# Altium PCB OmniCore_SDR.PcbDoc (part 3 of 14)
Units mil, origin at the board's own origin, x right, y up, seen from the top; angles counter-clockwise.
Board outline 4724.72 x 2755.91 mil, 8 copper layers (Top, GND 1, Layer 1, Layer 2, GND 2, Layer 3, Power, Bottom), stack 40.468 mil thick; 534 components, 427 nets, 2325 pads, 1892 vias.
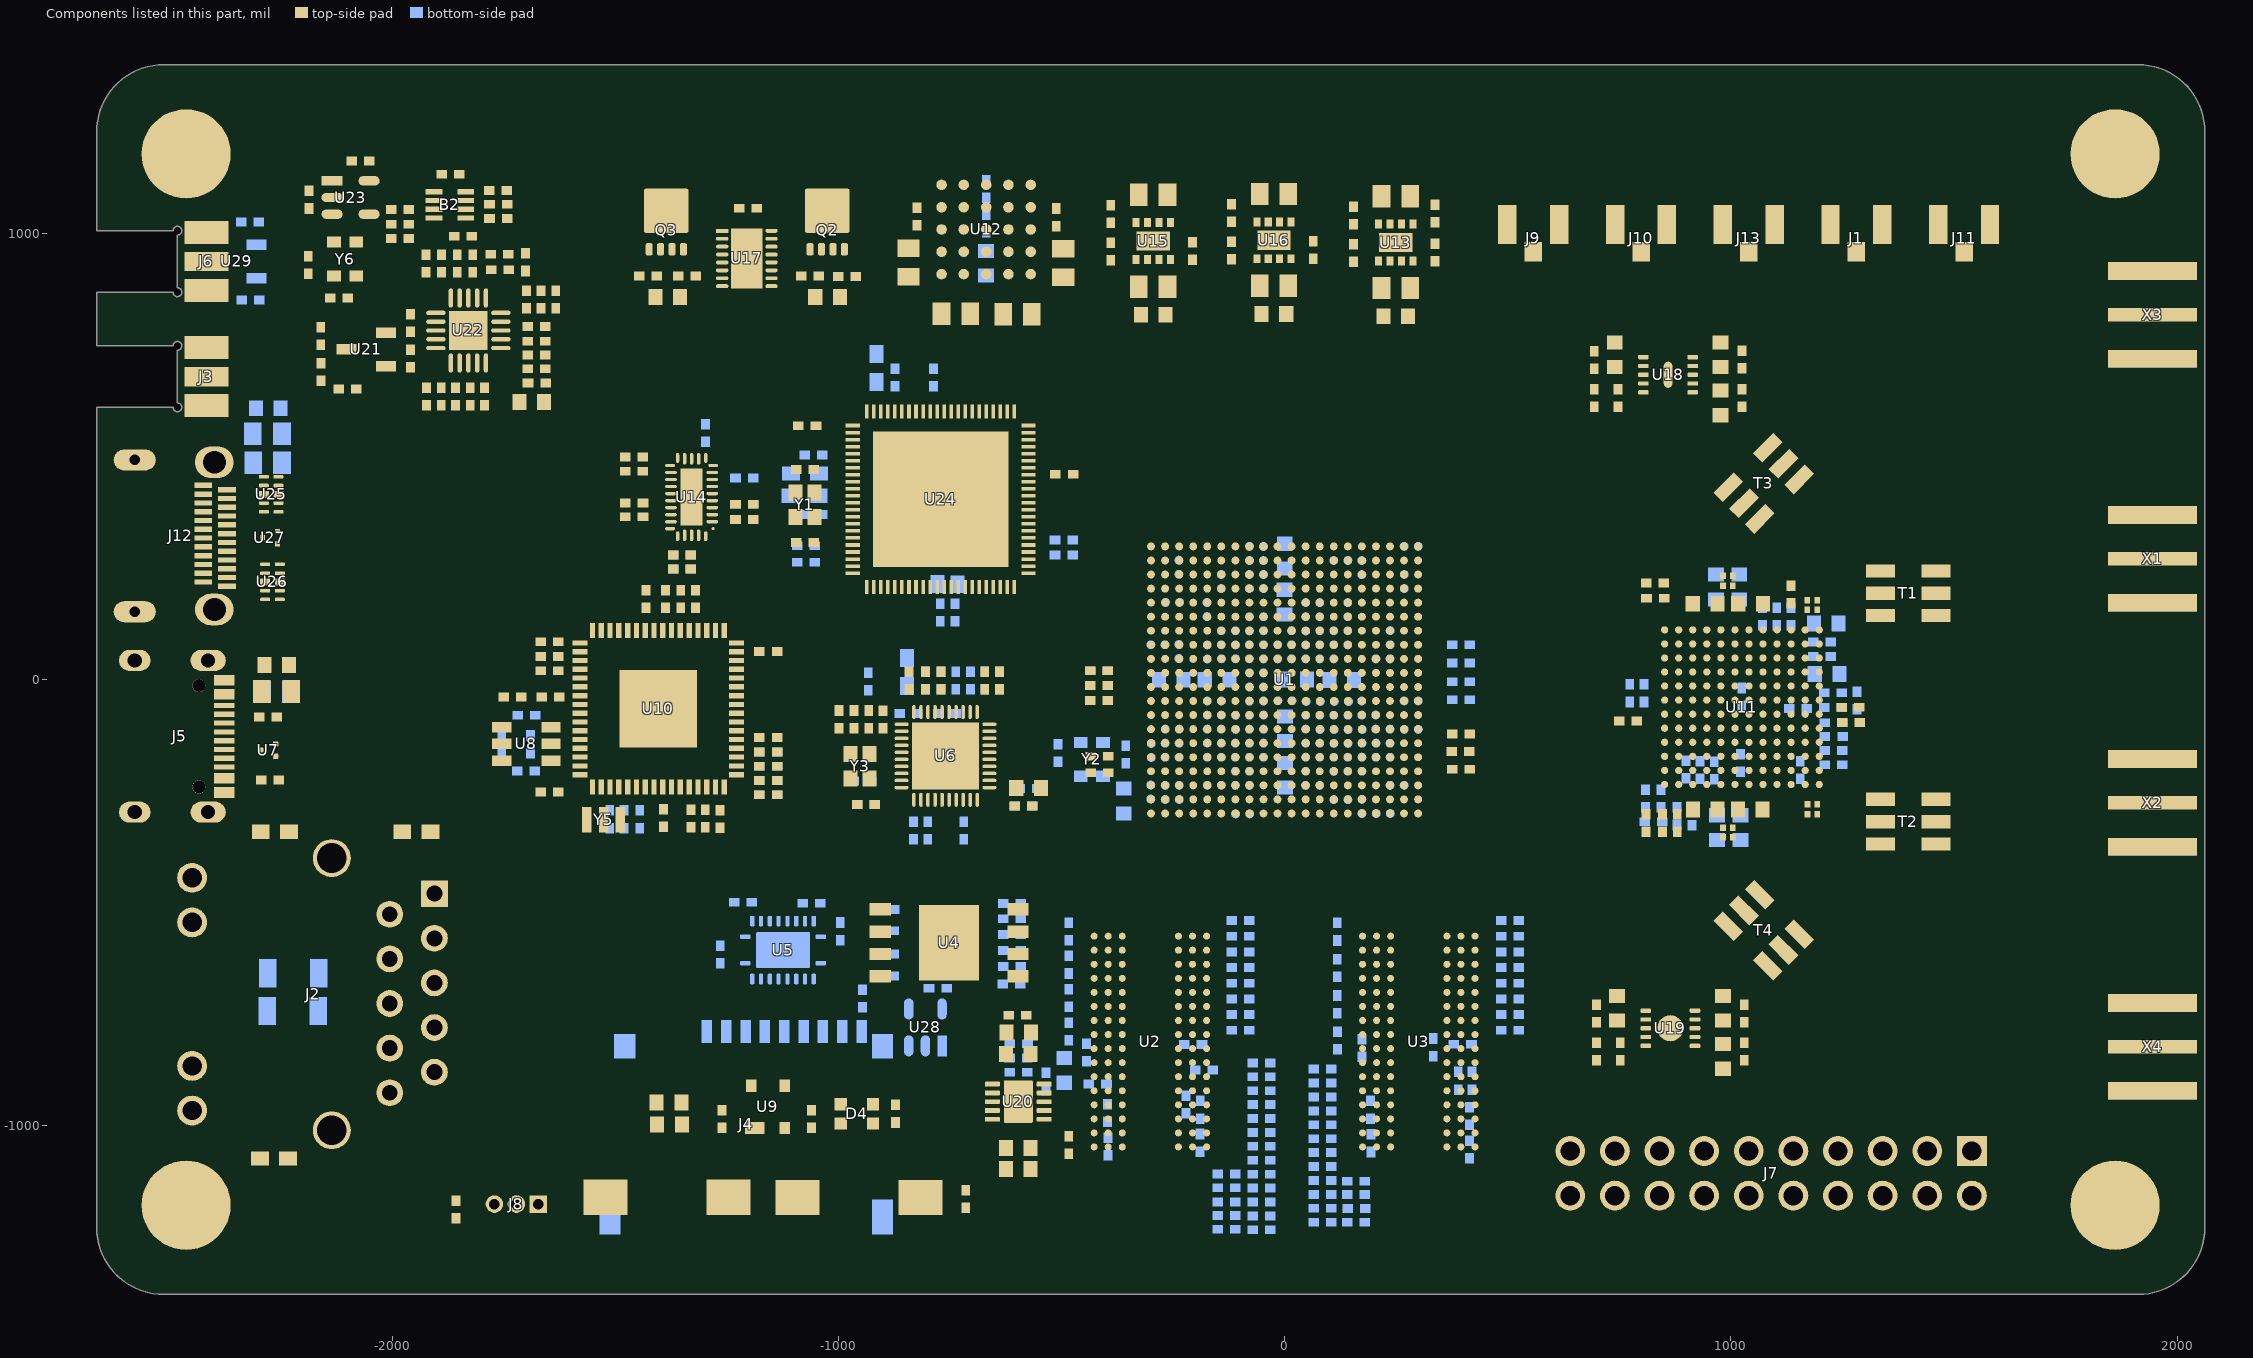
[diagram p8: the components of this part, seen from the top]

## Part data (continued)
U13 U15 U16: library part CMP-2000-07569-1, "Step-Down Converter MicroSiP(TM) Module with Integrated Inductor, 3 A, 3 to 17 V, -40 to 125 degC, 8-Pin uSiP (SIL), Tape and Reel", Case/Package=SMD/SMT, Manufacturer="Texas Instruments", Max Input Voltage=17V, Max Operating Temperature=125degC, Max Output Current=3A, Max Output Voltage=5V, Min Input Voltage=3V, Min Operating Temperature=-40degC, Min Output Voltage=900mV, Package Description="8-Pin Single In-line Package, Body 3 x 2.8 mm, Pitch 0.65 mm", Package Reference=SIL0008D, Quiescent Current=20uA, Switching Frequency=2MHz, Datasheet URL=http://www.ti.com/lit/ds/symlink/tps82130.pdf, Datasheet Version="Rev. C, 01/2017", Height=0.06inch, Lead Free=LeadFree, Length=0.12inch, Manufacturer URL=http://www.ti.com/, Mount=SurfaceMount, Mounting Technology=SurfaceMount, Number of Outputs=1, Number of Pins=8, Output Current=3A, Output Voltage=5V, Packaging=CutTape, REACH SVHC=NoSVHC, RoHSCompliant=True, Voltage - Output 1=5V, Width=0.11inch
U14: library part CMP-04877-000019-1, "USB TYPE-C DRP PORT CONTROLLER W", Max Operating Temperature=70°C, Max Supply Voltage=5.5V, Min Operating Temperature=0°C, Min Supply Voltage=3V, Data Rate=10Gbps, Lead Free="Lead Free", Mount="Surface Mount", Number of Pins=30, Number Of Ports=1, Packaging="Tape and Reel", REACH SVHC="No SVHC", RoHS Compliant=Yes, Usb Standard="USB 3.1"
U17: library part CMP-0479-00067-2, "IC OR CTRLR LOAD SHARE 16DFN", Case/Package="DFN EP", Max Operating Temperature=85°C, Max Supply Voltage=18V, Min Operating Temperature=-40°C, Min Supply Voltage=3V, Package Quantity=91, Lead Free="Lead Free", Number of Drivers=2, Number of Outputs=2, Number of Pins=16, Propagation Delay=1000ns, REACH SVHC="No SVHC", RoHS Compliant=Yes, Series=-, Turn-Off Delay Time=1us, Turn-On Delay Time=400ns
U18 U19: library part CMP-04917-000380-1, "1-A, ULTRA-LOW NOISE, ULTRA-HIGH"
U20: library part CMP-0395-00664-2, "Single Output LDO, 3 A, 2.375 to 3.5 V Input, with DDR Termination, 10-pin SON (DRC), -40 to 85 degC, Green (RoHS & no Sb/Br)", Manufacturer="Texas Instruments", Power Good=TRUE, Rating=Catalog, ComponentLink1Description="Manufacturer URL", ComponentLink1URL=http://www.ti.com/, ComponentLink2Description=Datasheet, ComponentLink2URL=http://www.ti.com/general/docs/lit/getliterature.tsp?genericPartNumber=TPS51200&fileType=pdf, ComponentLink3Description="Package Specification", ComponentLink3URL=http://www.ti.com/litv/pdf/mpds117k, ComponentLink4Description="URL Link1", ComponentLink4URL="Samples URL:http://www.ti.com/product/tps51200#samples", DatasheetVersion=SLUS812, Eco-Plan="Green (RoHS & no Sb/Br)", Iout(Max)(A)=3, Iq(Typ)(mA)=0.5, Mounting Technology="Surface Mount", PackageDescription="10-Pin Plastic Small Outline, Body 3 x 3 mm, Pitch 0.5 mm", PackageReference=DRC0010J, PackageVersion=4204102-3/L, PartNumber=TPS51200DRCR, SubFamily="Single Channel LDO", Vin(Max)(V)=3.5, Vin(Min)(V)=2.3
U22: library part CMP-0287-00009-1, "200 MHz Clock Generator PLL, CP-20-1, Pb-Free, 490 Tray", Frequency Range=10MHz-200MHz, Supply Current=4.5mA, Code_JEDEC=MO-220-VGGD-1, ComponentLink1Description="Manufacturer URL", ComponentLink1URL=www.analog.com, ComponentLink2Description=Datasheet, ComponentLink2URL=http://www.analog.com/static/imported-files/data_sheets/ADF4001.pdf, ComponentLink3Description="Package Specification", ComponentLink3URL=http://www.analog.com/static/imported-files/packages/PKG_PDF/LFCSP(CP)/CP_20_1.pdf, DatasheetVersion="REV. A", Max REFin (MHz)=104MHz, Max RF Input (MHz)=200MHz, Norm Phase Noise (dBc/Hz)=-217dBc, PackageDescription="20-Lead Lead Frame Chip Scale Package [LFCSP_VQ]", PackageReference=CP-20-1, PackageVersion=012508-B, Single/Dual=Single
U23 U28: library part CMP-04903-000078-1, "IC INVERTER 1CH 1-INP SOT23-5", Capacitance=22nF, Case/Package=SOT-23-5, Dielectric Material=PP, High Level Output Current=-32mA, Low Level Output Current=32mA, Max Operating Temperature=125°C, Max Supply Voltage=5.5V, Min Operating Temperature=-40°C, Min Supply Voltage=1.65V, Package Quantity=3000, Quiescent Current=10uA, Tolerance=5%, Voltage Rating (AC)=250V, Voltage Rating (DC)=400V, Lead Free="Lead Free", Logic Function=Buffer, Mount="Surface Mount", Number of Bits=1, Number of Circuits=1, Number of Elements=1, Number of Gates=1, Number of Inputs=1, Number of Pins=5, Output Current=32mA, Packaging="Tape and Reel", Propagation Delay=3.7ns, Radiation Hardening=No, REACH SVHC="No SVHC", RoHS Compliant=Yes, Series=74LVC, Technology=CMOS, Termination="PC Pins", Turn-On Delay Time=7.5ns, Weight=0.000557oz
U24: "RISC-V FPU HD-MCU, 384MHz, USB3.0 & PD, 100M Ethernet, DVP, QSPI, OPA, ADC, DAC"
U25 U26: library part CMP-0326-00027-3, "ESD Solution for Super-Speed (6 GBPS) USB 3.0 Interface, 4 Channels, -40 to +85 degC, 10-pin SON (DQA), Green (RoHS & no Sb/Br)", Breakdown Voltage(Min)(V)=8, Differential Capacitance(pF)=0.05, IO Capacitance(Typ)(pF)=0.8, IO Leakage Current(nA)=10, Manufacturer="Texas Instruments", 1394 / Firewire=TRUE, ComponentLink1Description="Manufacturer URL", ComponentLink1URL=http://www.ti.com/, ComponentLink2Description=Datasheet, ComponentLink2URL=http://www.ti.com/general/docs/lit/getliterature.tsp?genericPartNumber=TPD4EUSB30&fileType=pdf, ComponentLink3Description="URL Link1", ComponentLink3URL=SamplesURL:http://www.ti.com/product/tpd4eusb30#samples, DatasheetVersion=SLVSAC2C, Eco-Plan="Green (RoHS & no Sb/Br)", HDMI=TRUE, IEC 61000-4-2 Air-Gap(+/- kV)=8, IEC 61000-4-2 Contact(+/- kV)=8, Mounting Technology="Surface Mount", PackageDescription="10-Pin Plastic Small Outline No-Lead, 1 x 2.5 x 0.55 mm Body, 0.5 mm Pitch", PackageReference=DQA0010A, PackageVersion="revB, Sep-2009", PartNumber=TPD4EUSB30DQAR, Serial ATA / eSATA=TRUE, SubFamily="ESD Solution", USB Full Speed=TRUE, USB High Speed=TRUE, USB Super Speed=TRUE
X1 X2 X3 X4: library part SMA_1
Y1 Y3: library part XTAL-PASS
Y2 Y6: library part XTALS, "贴片有源晶振"
Y5: library part XTAL-3PIN, "贴片晶振"

## Via types
v1: diameter 16, hole 8, Top to Bottom, tented both sides, 1844 vias
v2: diameter 19.68, hole 7.87, Top to Bottom, 44 vias
v3: diameter 200, hole 125, Top to Bottom, 4 vias